# Altium PCB Kasli-DIOT.PCBDOC (part 6 of 23)
Units mm, origin at the board's own origin, x right, y up, seen from the top; angles counter-clockwise.
Board outline 222.9 x 100 mm, 10 copper layers (TopLayer, Layer 2, Layer 3, Layer 4, Layer 5, Layer 6, Layer 7, layer 8, Layer 9, BottomLayer), stack 1.564 mm thick; 977 components, 900 nets, 4676 pads, 2725 vias.
Unrouted connection lines stored in the file: 17.
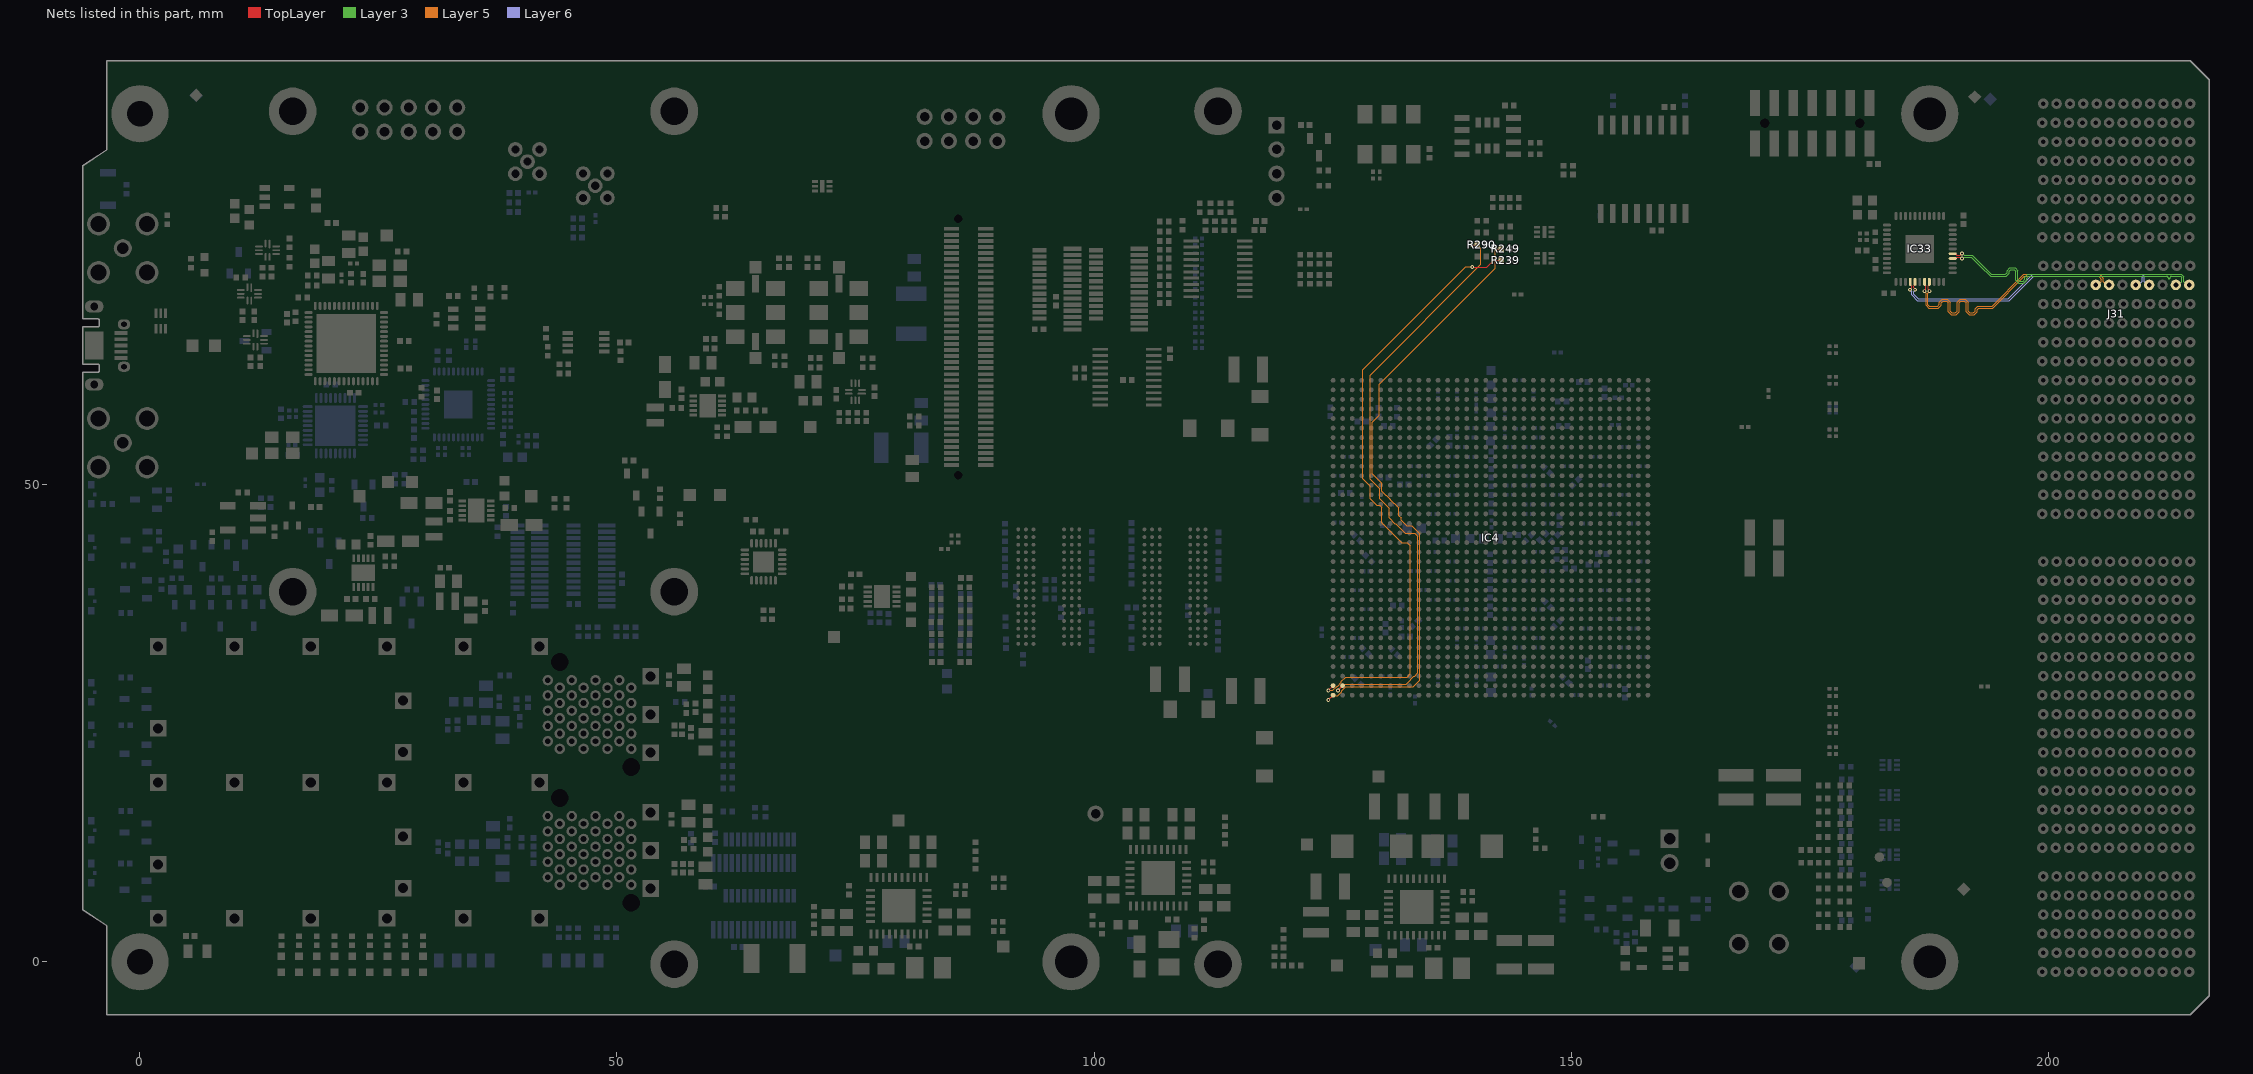
[diagram p12: the nets of this part, all layers, seen from the top]

## Part data (continued)
T8 T9 T10 T15: "NPN Transistor", Case=SOT23-3, Manufacturer="NXP SEMICONDUCTORS", Author="CERN DEM JLC", Bonding=No, Component Type=Standard, ComponentHeight=1.1mm, CreateDate=14.06.2011, Device=BC847B, HelpURL=\\cern.ch\dfs\Applications\Altium\Datasheets\BC847B.pdf, LatestRevisionDate=14.06.2011, Manufacturer Part Number=BC847B, Mounted=Yes, PackageDescription="SOT23, 3 pin, Pitch 0.95mm - 1.3mm W X 2.9mm L X 1.1mm H, IPC Medium Density", Part Description="45V 100mA NPN general-purpose transistors", Part Number=BC847B, Pin Count=3, PressFit=No, Sense=No, SMD=Yes, Socket=No
TP1 TP2 TP3 TP4 TP5 TP6 TP7 TP8 TP9 TP10 TP11 TP12 TP15 TP16 TP17 TP18 TP19 TP20 TP21 TP22 TP23 TP24 TP25 TP34 TP36: library part SMD_PAD_1.27X1.27MM, Author="CERN DEM JLC", ComponentHeight=0mm, Component Type="Standard (No BOM)", CreateDate=12.01.2008, Family="Test Point", HelpURL=Undefined, LatestRevisionDate=12.01.2008, Mounted=No, PackageDescription="1.27mm x 1.27mm PCB Copper Area (SMD Test Point)", Part Description="1.27mm x 1.27mm PCB Copper Area (SMD Test Point)", Part Number=SMD_PAD_1.27X1.27MM, Pin Count=1, Sense=No, SMD=Yes, Socket=No, Status=None
TP26 TP27 TP28 TP29 TP30 TP31 TP32 TP33 TP35: library part PLATED_HOLE1.0_PAD1.7, "Single Terminal Socket", Author="CERN DEM JLC", ComponentHeight=0mm, Component Type="Standard (No BOM)", CreateDate=11.05.2017, Family="Plated Hole", HelpURL=Undefined, LatestRevisionDate=11.05.2017, Mounted=No, PackageDescription="Plated Through Hole: Hole Dia.=1.0mm Pad Dia.=1.7mm,  IPC-7251 Level A", Part Description="Plated Through Hole: Hole Dia.=1.0mm Pad Dia.=1.7mm,  IPC-7251 Level A", Part Number=PLATED_HOLE1.0_PAD1.7, Pin Count=1, Sense=No, SMD=No, Socket=No, Status=None
TR1: library part XFMR_MINI-CIRCUITS_TC2-1TX+, "50 Ohms 3 to 300MHz RF Transformer", Manufacturer=MINI-CIRCUITS, Manufacturer Part Number=TC2-1TX+, Author="CERN DEM MR", Component Type=Standard, ComponentHeight=4.06mm, CreateDate=18.10.2019, HelpURL=\\cern.ch\dfs\Applications\Altium\Datasheets\XFMR_MINI-CIRCUITS_TC2-1TX+.pdf, LatestRevisionDate=18.10.2019, Mounted=Yes, Part Description="50 Ohms 3 to 300MHz RF Transformer", Part Number=XFMR_MINI-CIRCUITS_TC2-1TX+, Pin Count=5, Sense=No, SMD=Yes, Socket=No, Status=None
W1: library part SAMTEC_HTSW-104-23-L-S, "4 Mini Wire-Wrap Contact Strip Header", Manufacturer=SAMTEC, Manufacturer Part Number=HTSW-104-23-L-S, Author="CERN DEM JLC", Component Type=Standard, ComponentHeight=8.38mm, CreateDate=22/02/2018, Family="Header 4", HelpURL=\\cern.ch\dfs\Applications\Altium\Datasheets\SAMTEC_HTSW-104-23-L-S.pdf, LatestRevisionDate=22/02/2018, Mounted=Yes, Part Description="4 Contacts, Pitch 2.54mm, Single Row  Through Mount Straight Header (Post Lead 5.84mm, Tail Lead 2.92mm, Insulator 2.54mm)", Part Number=SAMTEC_HTSW-104-23-L-S, Pin Count=4, PressFit=No, Sense=No, SMD=No, Socket=No, Status=Preferred, Status Comment="High Temperature"
WASHER1 WASHER2: library part Keystone_7687, "SMA_Shoulder Washer", Manufacturer=Keystone, Manufacturer Part Number=7687, Part Number="Keystone 7687", Author=GK, Component Type=Mechanical, ComponentHeight=1.91mm, CreateDate=28.01.2016, HelpURL=\\cern.ch\dfs\Applications\Altium\Datasheets\AAVID-THERMALLOY_7721-7PPSG.pdf, LatestRevisionDate=28.01.2016, Mounted=Yes, PackageDescription="Polyphenylene Sulfide PPS Shoulder Washer", Part Description="Polyphenylene Sulfide PPS Shoulder Washer", Pin Count=0, PressFit=No, Sense=No, SMD=No, Socket=No, Status=None

## Free pads (board coordinates)
  round 5 hole 2.9: 3(16,38.8) 3(16,89.15) 3(56,-0.25) 3(56,38.8) 3(56,89.15) 3(113,-0.25) 3(113,89.15)

## Via types
v1: diameter 0.4, hole 0.2, TopLayer to BottomLayer, tented both sides, 1723 vias
v2: diameter 0.5, hole 0.2, TopLayer to BottomLayer, tented both sides, 524 vias
v3: diameter 0.6, hole 0.3, TopLayer to BottomLayer, tented both sides, 172 vias
v4: diameter 0.6, hole 0.3, TopLayer to BottomLayer, 113 vias
v5: diameter 0.5, hole 0.2, TopLayer to BottomLayer, 107 vias
v6: diameter 0.4, hole 0.2, TopLayer to BottomLayer, 67 vias
v7: diameter 0.5, hole 0.25, TopLayer to BottomLayer, tented both sides, 12 vias
v8: diameter 0.8, hole 0.5, TopLayer to BottomLayer, tented both sides, 7 vias

## Nets (pads, with @x,y where several pads share a name; then routed paths per layer and width w, separated by ;. In a path a pad name is that pad's centre, name@x,y a point inside that pad or via, vN(x,y) a via of type N, cw(c..) or ccw(c..) an arc to the next point about the centre after c; other vN are vias at no path point)
1_PE_CLK_N: IC33.37 J31.B5 | length 28.6
  TopLayer w0.095: IC33.37@190.011,73.725 190.305,73.725 190.444,73.864 190.606,73.864 190.61,73.86 190.781,73.86 190.934,73.707 v1(190.989,73.707)
  Layer 3 w0.075: v1(190.989,73.707) 191.033,73.707 191.196,73.87 191.956,73.87 192.861,72.964 193.975,71.85 195.435,71.85 195.616,71.85 195.915,72.15 195.915,72.377 196.096,72.558 196.459,72.558 196.64,72.377 196.64,71.442 196.94,71.142 197.47,71.142 197.769,71.442 197.769,71.669 197.95,71.85 198.857,71.85 212.203,71.85 212.466,71.85 cw(c212.466,71.738) 212.578,71.738 212.578,71.699 ccw(c212.691,71.699) 212.691,71.587 ccw(c212.691,71.699) 212.803,71.699 212.803,71.738 cw(c212.916,71.738) 212.916,71.85 213.596,71.85 213.899,71.85 213.999,71.75 213.999,71.451 213.999,71.305 213.644,70.95 J31.B5@213.4,70.95
1_PE_CLK_P: IC33.38 J31.A5 | length 28.6
  TopLayer w0.095: IC33.38@190.011,74.225 190.305,74.225 190.444,74.086 190.698,74.086 190.702,74.082 190.781,74.082 190.934,74.234 v1(190.989,74.234)
  Layer 3 w0.075: v1(190.989,74.234) 191.033,74.234 191.196,74.072 192.039,74.072 192.945,73.166 194.059,72.052 195.435,72.052 195.532,72.052 195.713,72.233 195.713,72.46 196.013,72.76 196.543,72.76 196.842,72.46 196.842,71.525 197.023,71.344 197.386,71.344 197.567,71.525 197.567,71.752 197.867,72.052 198.857,72.052 213.982,72.052 214.201,71.834 214.201,71.367 214.201,71.305 214.556,70.95 J31.A5@214.8,70.95
1SERVMOD: IC4.AN1 R239.1 | length 64.2
  TopLayer w0.127: v1(124.561,28.45) IC4.AN1@125.061,28.95 ; v1@139.645,72.825 141.178,72.825 141.896,73.543 R239.1@142.685,73.543 142.685,73.523 R239.1@142.458,73.296
  Layer 5 w0.1: v1(124.561,28.45) 125.028,28.45 125.485,28.907 125.552,28.907 125.938,29.294 125.938,29.4 126.365,29.827 132.813,29.827 133.165,30.179 133.165,43.621 132.846,43.94 132.243,43.94 130.184,45.999 130.184,47.627 129.961,47.85 129.628,47.85 128.938,48.54 128.938,49.873 128.188,50.623 128.188,51.29 128.184,51.294 128.184,62.084 138.95,72.85 v1@139.645,72.85
  other v1: 139.645,72.817
2_PE_CLK_N: IC33.26 J31.E5 | length 28.3
  TopLayer w0.095: v1(185.548,70.45) 185.548,70.506 185.7,70.658 185.7,70.842 185.561,70.981 IC33.26@185.561,71.275
  Layer 6 w0.08: v1(185.548,70.45) 185.548,70.403 185.708,70.243 185.708,69.902 186.318,69.291 195.924,69.291 198.494,71.862 207.9,71.862 209.2,71.862 209.749,71.862 209.861,71.75 209.861,71.351 209.46,70.95 J31.E5@209.2,70.95
2_PE_CLK_P: IC33.27 J31.D5 | length 28.2
  TopLayer w0.095: IC33.27@186.061,71.275 186.061,70.981 185.922,70.842 185.922,70.658 186.075,70.506 v1(186.075,70.45)
  Layer 6 w0.08: v1(186.075,70.45) 186.075,70.403 185.915,70.243 185.915,69.988 186.404,69.498 195.838,69.498 198.408,72.069 209.835,72.069 210.068,71.836 210.068,71.3 210.417,70.95 J31.D5@210.6,70.95
2SERVMOD: IC4.AP1 R249.1 | length 64.8
  TopLayer w0.127: v1(124.561,27.45) IC4.AP1@125.061,27.95 ; v1(142.081,74.706) 142.665,74.706 R249.1@142.685,74.726
  Layer 5 w0.1: v1(124.561,27.45) 125.012,27.901 125.561,27.901 125.983,28.323 125.983,28.405 126.405,28.827 133.471,28.827 134.165,29.521 134.165,44.846 133.318,45.693 132.785,45.693 132.184,46.294 132.184,46.527 131.938,46.773 131.938,47.606 131.471,48.073 131.405,48.073 131.061,48.417 131.061,48.483 130.656,48.889 130.589,48.889 130.165,49.313 130.165,50.181 129.165,51.181 129.165,56.549 129.911,57.295 129.911,60.524 142.081,72.694 v1(142.081,74.706)
3_PE_CLK_N: IC33.29 J31.H5 | length 27.9
  TopLayer w0.095: v1(187.051,70.296) 187.051,70.352 187.203,70.505 187.203,70.63 187.2,70.633 187.2,70.842 187.061,70.981 IC33.29@187.061,71.275
  Layer 5 w0.08: v1(187.051,70.296) 187.051,70.25 187.211,70.09 187.211,68.807 187.486,68.532 188.324,68.532 188.51,68.532 188.814,68.836 188.814,69.058 188.996,69.24 189.361,69.24 189.544,69.058 189.544,68.128 189.848,67.824 190.384,67.824 190.688,68.128 190.688,69.058 190.87,69.24 191.235,69.24 191.418,69.058 191.418,68.128 191.722,67.824 192.258,67.824 192.562,68.128 192.562,68.35 192.744,68.532 193.14,68.532 194.227,68.532 197.532,71.838 205.325,71.838 205.596,71.567 205.596,71.453 205.596,71.301 205.245,70.95 J31.H5@205,70.95
3_PE_CLK_P: IC33.30 J31.G5 | length 27.9
  TopLayer w0.095: IC33.30@187.561,71.275 187.561,70.981 187.422,70.842 187.422,70.725 187.425,70.722 187.425,70.505 187.578,70.352 v1(187.578,70.296)
  Layer 5 w0.08: v1(187.578,70.296) 187.578,70.25 187.418,70.09 187.418,68.893 187.572,68.739 188.324,68.739 188.424,68.739 188.607,68.922 188.607,69.143 188.911,69.447 189.447,69.447 189.751,69.143 189.751,68.214 189.933,68.031 190.298,68.031 190.481,68.214 190.481,69.143 190.785,69.447 191.321,69.447 191.625,69.143 191.625,68.214 191.807,68.031 192.172,68.031 192.355,68.214 192.355,68.435 192.659,68.739 193.14,68.739 194.141,68.739 197.447,72.045 205.411,72.045 205.803,71.652 205.803,71.368 205.803,71.301 206.154,70.95 J31.G5@206.4,70.95
3SERVMOD: IC4.AN2 R290.1 | length 63.7
  TopLayer w0.127: v1(125.561,28.45) IC4.AN2@126.061,28.95 ; v1(139.561,75.133) 140.147,75.133 R290.1@140.192,75.178
  Layer 5 w0.1: v1(125.561,28.45) 126.188,29.077 126.401,29.077 126.405,29.073 126.717,29.073 126.721,29.077 128.401,29.077 128.405,29.073 132.717,29.073 133.184,29.54 133.184,29.606 133.528,29.95 133.594,29.95 133.938,30.294 133.938,44.606 133.619,44.925 132.619,44.925 131.611,45.933 131.544,45.933 130.938,46.54 130.938,47.54 129.938,48.54 129.938,49.606 128.938,50.606 128.938,61.472 140.561,73.095 140.561,74.775 140.203,75.133 v1(139.561,75.133)